# EAGLE board rear-port-av (EAGLE 9.7.0)
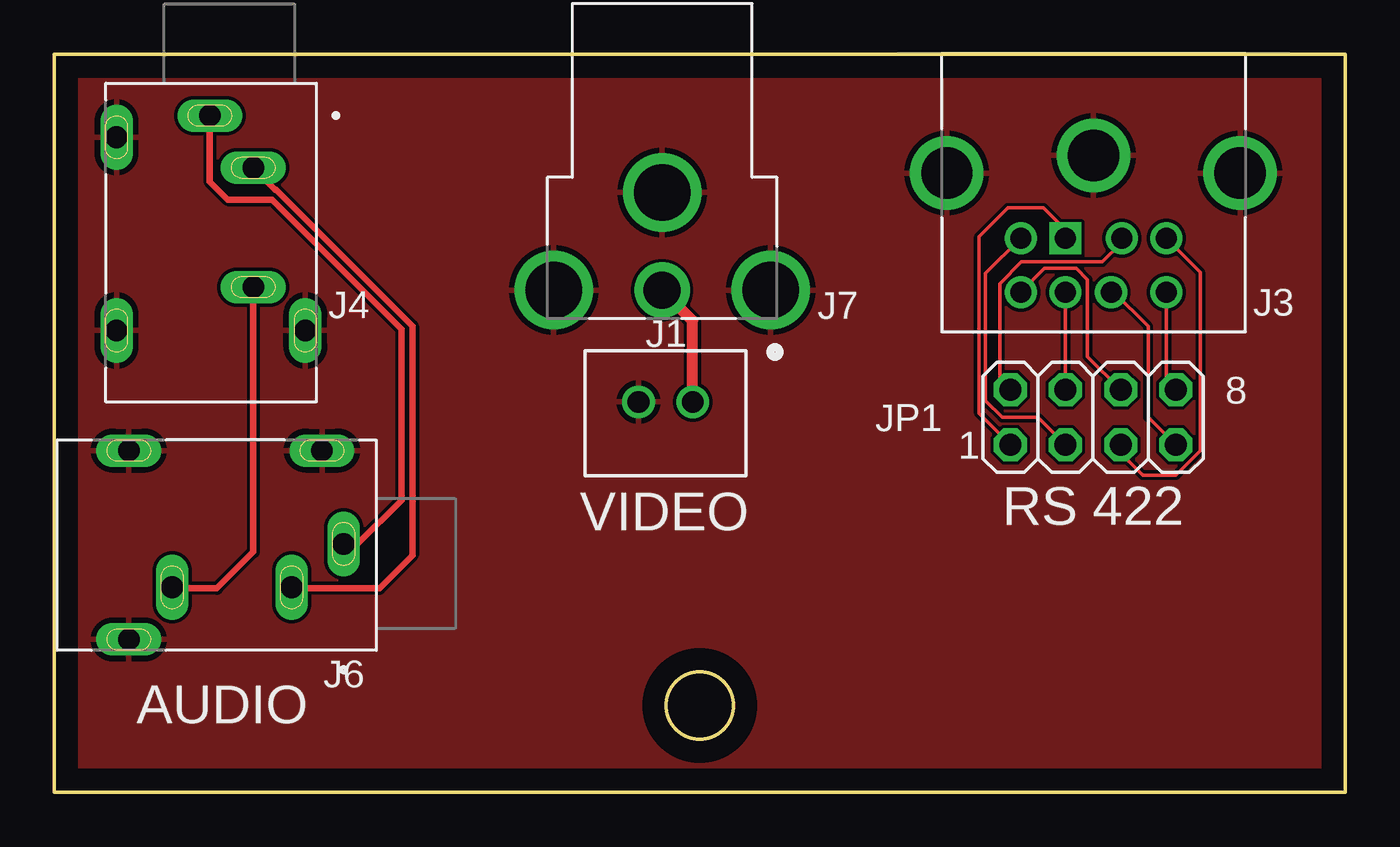
[diagram p0: board, top side]

Size 59.5 x 34 mm. Coordinates in mm from the lower left corner, seen from the top.
Outline: 59.5,0 59.5,34 0,34 0,0 59.5,0
Outline: circle at 29.75,4 radius 1.55
Copper layers (1*16): Top 0.035mm / dielectric 1.5mm / Bottom 0.035mm
Design rules "Fusion Electronics Design Rules": minimum track width 6mil, minimum drill 0.35mm, track to track 6mil, track to pad 6mil, pad to pad 6mil, via to via 6mil, smd to smd 6mil, copper to edge 40mil, drill to drill 6mil, minimum pad ring 10mil, minimum via ring 8mil, stop-mask expansion 4mil, vias tented up to drill 9999mil, thermal gap 10mil

## Footprints (pad centres in the part's own frame; a part is rotated, then mirrored left to right if it is on the bottom)
B2B-XH-A = drill 1: 1 0,0; 2 2.5,0
TE_1658998-1 = drill 0.97 square: 1 -1.3,-8.51 | drill 0.97: 2 1.3,-8.51; 3 -3.35,-8.51; 4 -1.3,-11; 5 3.35,-8.51; 6 -3.35,-11; 7 0.81,-11; 8 3.35,-11 | drill 2.37: S1 -6.76,-5.51; S2 0,-4.7; S3 6.76,-5.51
CUI_SJ1-3533NS = drill 1 pad 1.4 long: 1 0,0; 2 2.4,2; 3 7.9,2; SH1 1,-4.3; SH2 9.9,-4.3; SH3 9.9,4.4
CUI_RCJ-011 = drill 2.6: 1A 5.95,5; 1B 5.95,-5; 1C 1.45,0 | drill 1.7: 2 5.95,0
2X04 = drill 1.016 octagon: 1 -3.81,-1.27; 2 -3.81,1.27; 3 -1.27,-1.27; 4 -1.27,1.27; 5 1.27,-1.27; 6 1.27,1.27; 7 3.81,-1.27; 8 3.81,1.27

## Placement (x,y rotation side)
J1  B2B-XH-A  [B2B-XH-A]  26.92,17.98 0 top
J3  1658998-1  [TE_1658998-1]  47.9,34.04 0 top
J4  SJ1-3533NS  [CUI_SJ1-3533NS]  7.17,31.17 270 top
J6  SJ1-3533NS  [CUI_SJ1-3533NS]  13.34,11.44 180 top
J7  RCJ-011  [CUI_RCJ-011]  28.02,29.08 270 top
JP1  PINHD-2X4  [2X04]  47.88,17.27 0 top

## Library data of the parts
J1 = Connector; CATEGORY: Connectors; DATASHEET: https://www.jst-mfg.com/product/pdf/eng/eXH.pdf; DESCRIPTION: Connector Header Through Hole 2 position 0.098" (2.50mm); MANUFACTURER: JST Sales America Inc.; MPN: B2B-XH-A; OPERATING_TEMPERATURE: -25°C ~ 85°C; PACKAGE_SIZE: NA; PACKAGE_TYPE: Through Hole; PART_STATUS: Active; PITCH: 0.098" (2.50mm); ROHS: Compliant; SERIES: XH; SUBCATEGORY: Rectangular Connectors; TYPE: Male Headers
J3 = Mini Din 8 POS 1658998-1; AVAILABILITY: In Stock; CHECK_PRICES: https://www.snapeda.com/parts/1658998-1/TE+Connectivity+AMP+Connectors/view-part/?ref=eda; DESCRIPTION: Connector, Mini Circular DIN, Receptacle Assy w/ Hold Down, 8 Pos., Right Angle | TE Connectivity 1658998-1; MF: TE Connectivity AMP Connectors; MP: 1658998-1; PACKAGE: None; PRICE: None; SNAPEDA_LINK: https://www.snapeda.com/parts/1658998-1/TE+Connectivity+AMP+Connectors/view-part/?ref=snap
J4 J6 = 1/8" SJ1-3533NS; AVAILABILITY: In Stock; CHECK_PRICES: https://www.snapeda.com/parts/SJ1-3533NS/Same+Sky/view-part/?ref=eda; DESCRIPTION: 3.50mm (0.141, 1/8, Mini Plug) - Headphone Phone Jack Stereo (3 Conductor, TRS) Connector Solder; MF: Same Sky; MP: SJ1-3533NS; PACKAGE: None; PRICE: None; SNAPEDA_LINK: https://www.snapeda.com/parts/SJ1-3533NS/Same+Sky/view-part/?ref=snap
J7 = RCA RCJ-011; AVAILABILITY: In Stock; CHECK_PRICES: https://www.snapeda.com/parts/RCJ-011/Same+Sky/view-part/?ref=eda; DESCRIPTION: Metal Right-Angle, RCA Jack, Black Insulator; MF: Same Sky; MP: RCJ-011; PACKAGE: None; PRICE: None; SNAPEDA_LINK: https://www.snapeda.com/parts/RCJ-011/Same+Sky/view-part/?ref=snap
JP1 = Connector; CATEGORY: Connectors; DESCRIPTION: Header-Straight-2x4 Position; PACKAGE_TYPE: Through Hole; PITCH: 0.100" (2.54mm); SUBCATEGORY: Headers; TYPE: Male Pins

## Nets
D1: J3.1 JP1.1
D2: J3.2 JP1.2
D3: J3.3 JP1.3
D4: J3.4 JP1.4
D5: J3.5 JP1.5
D6: J3.6 JP1.6
D7: J3.7 JP1.7
D8: J3.8 JP1.8
GND: J1.1 J3.S1 J3.S2 J3.S3 J4.SH1 J4.SH2 J4.SH3 J6.SH1 J6.SH2 J6.SH3 J7.1A J7.1B J7.1C
N$1: J4.1 J6.1
N$2: J1.2 J7.2
N$6: J4.3 J6.3
N$7: J4.2 J6.2

## Tracks (layer width: path | path; a pad name or v marks a point on that pad's centre or on a via)
D1
  Top 0.152: J3.1 46.6,25.92 45.59,26.92 43.94,26.92 42.62,25.6 42.62,17.45 JP1.1
D2
  Top 0.152: J3.2 49.2,25.32 48.31,24.43 44.58,24.43 43.58,23.44 43.58,19.03 JP1.2
D3
  Top 0.152: J3.3 42.93,23.9 42.93,18.03 43.69,17.27 45.34,17.27 JP1.3
D4
  Top 0.152: J3.4 46.61,23.03 JP1.4
D5
  Top 0.152: JP1.5 49.15,15.62 50.16,14.61 51.69,14.61 52.81,15.73 52.81,23.96 J3.5
D6
  Top 0.152: J3.6 45.64,24.13 47.12,24.13 47.62,23.62 47.62,20.07 JP1.6
D7
  Top 0.152: JP1.7 50.42,17.27 50.42,21.46 48.85,23.04 J3.7
D8
  Top 0.152: J3.8 51.25,18.98 JP1.8
GND
  pour Top: -1.19,-1.19 65.96,-1.19 65.96,35.48 -1.19,35.48
N$1
  Top 0.305: J4.1 7.17,28.13 8,27.3 10.03,27.3 16,21.34 16,13.46 13.98,11.44 J6.1
N$2
  Top 0.508: J1.2 29.42,21.73 J7.2
N$6
  Top 0.152: 5.63,9.44 J6.3
  Top 0.305: J4.3 9.17,11.08 7.49,9.4 5.48,9.4 J6.3
N$7
  Top 0.305: J6.2 10.98,9.4 14.99,9.4 16.51,10.92 16.51,21.48 10.22,27.76 10.18,27.76 J4.2

## Text on the board
tPlace: 8 | 1 | VIDEO | RS 422 | AUDIO